# Altium PCB PCB3.PcbDoc
Units mil, origin at the board's own origin, x right, y up, seen from the top; angles counter-clockwise.
Board outline 954.83 x 960.81 mil, 2 copper layers (Top Layer, Bottom Layer); 36 components, 33 nets, 168 pads, 30 vias.
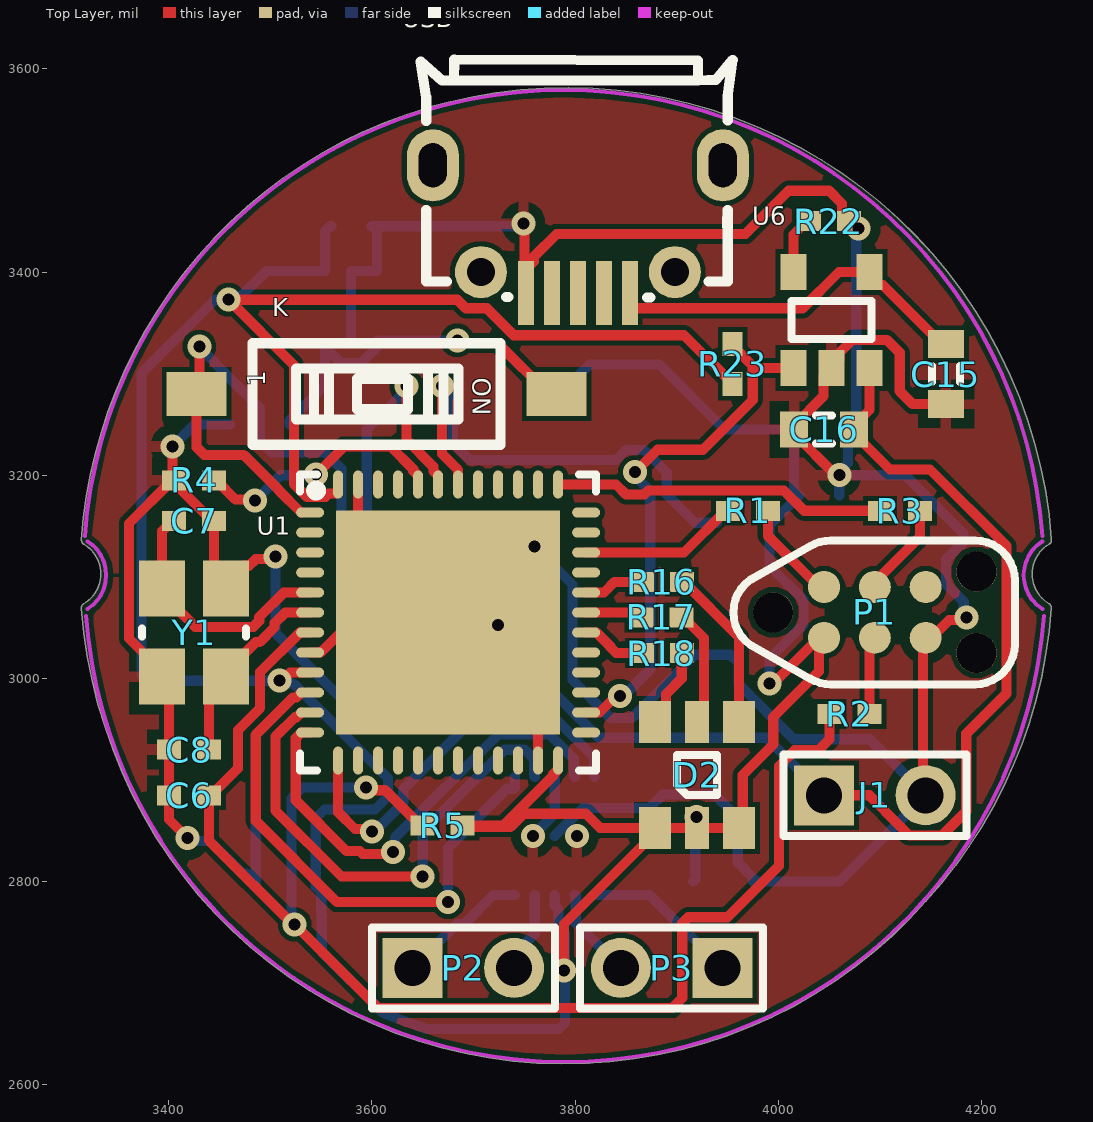
[diagram p0: Top Layer view]
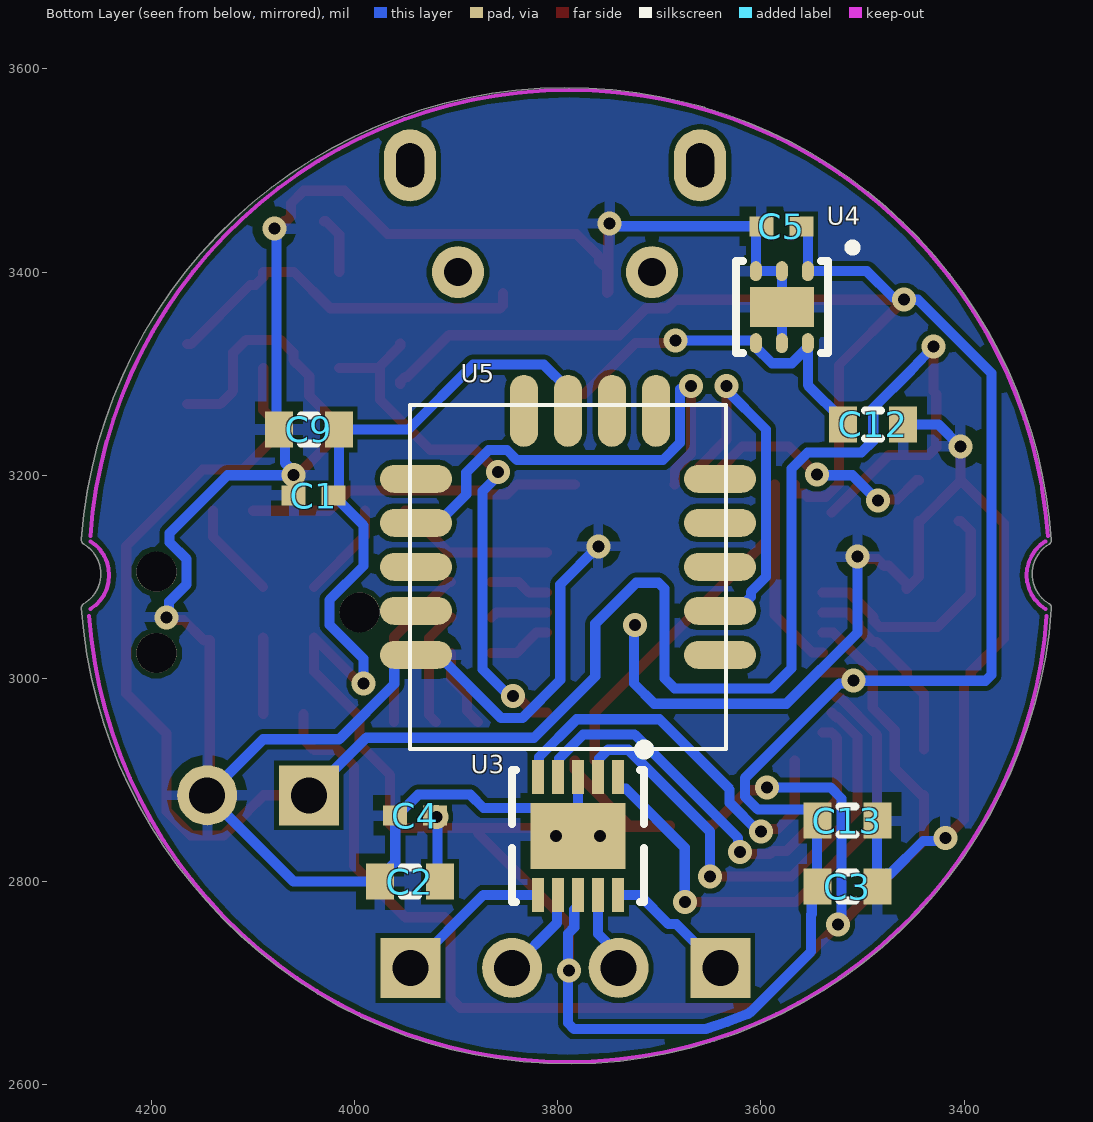
[diagram p1: Bottom Layer view, seen from below]

## Layer stack, top to bottom
Top Solder: solder mask 0.4, Solder Resist, Dk 3.5
Top Layer: signal copper 1.4
Dielectric 1: dielectric 12.6, FR-4, Dk 4.8
Bottom Layer: signal copper 1.4
Bottom Solder: solder mask 0.4, Solder Resist, Dk 3.5

## Board outline
3314.12,3068.48 cw(c3319.06,3069.36) 3316.51,3073.68 ccw(c3299.33,3102.83) 3333.17,3102.83 ccw(c3299.33,3102.83) 3316.53,3131.98 cw(c3319.08,3136.29) 3314.08,3136.65 cw(c3791.46,3102.83) 3365.62,3321.22 cw(c3788.74,3106.63) 3722.2,3576.37 cw(c3791.46,3102.83) 4268.79,3137.19 4268.87,3136.31 cw(c4263.86,3136.31) 4266.4,3131.99 ccw(c4283.58,3102.83) 4266.38,3073.69 cw(c4263.83,3069.37) 4268.84,3069.37 4268.83,3069.02 cw(c3791.46,3102.83) 4145.43,2780.76 cw(c3790,3095) 3345.37,2929.52 cw(c3791.46,3102.83)

## Design rules (kind name [scope] priority, off if disabled: settings)
Clearance [All] p1: gap=5 ignorepadtopadclearanceinfootprint=FALSE except(0: Arc-Hole Track-Hole SMDPad-Hole THPad-Hole Via-Hole Fill-Hole Poly-Hole Region-Hole Text-Hole)
PolygonConnect [All] p1: connectstyle=Relief reliefconductorwidth=10 reliefentries=4 polygonreliefangle="90 Angle" airgapwidth=10
RoutingVias [All] p1: holewidth=28 width=50 viastyle="Through Hole" minholewidth=28 minwidth=50 maxholewidth=28 maxwidth=50
SolderMaskExpansion [All] p1: expansion=4 istentingtop=FALSE
Width [All] p1: maxlimit=10 minlimit=10 preferedwidth=10
30 further rules are at their usual default settings.

## Classes and differential pairs
net class RGBLED[1..3]: RGBLED1 RGBLED2 RGBLED3
net class MOTOR_CONTROL[1..4]: MOTOR_CONTROL1 MOTOR_CONTROL2 MOTOR_CONTROL3 MOTOR_CONTROL4

## Components (designator, comment, footprint, x,y, rotation, side; value= is the part's Value field where it differs from the comment)
C1 "10nF" 0402 4040.32,3180 r180 bottom
C2 "1uF" 0603 3945.47,2800 r180 bottom
C3 "4.7uF" 0603 3515,2795 r0 bottom
C4 "100nF" 0402 3940.32,2865 r180 bottom
C5 "100nF" 0402 3580,3445 r180 bottom
C6 "100nF" 0402 3420,2885 r0 top
C7 "22pF" 0402 3425,3155 r180 top
C8 "22pF" 0402 3420,2930 r0 top
C9 "10uF" 0603 4045,3245 r180 bottom
C12 "1uF" 0603 3489.53,3250 r0 bottom
C13 "1uF" 0603 3515,2860 r0 bottom
C15 "4.7uF" 0603 4165,3299.53 r90 top
C16 "4.7uF" 0603 4045,3245 r0 top
D2 "SMLVN6RGB1W1" "3.5x2.8 mm 6-SMD" 3920,2905 r90 top
J1 "78171-0002" HDR1*2 4095,2885 r90 top
K "2.54-1P-PGT" SW-SMD_2P-L6.2-LS9.4 3610,3280 r0 top net-tie
P1 "TC2030-IDC-NL" TC2030-IDC-NL 4095,3065 r0 top
P2 "HEADER 2X1 0.05\" UNPOLARIZED" HDR1*2 3690,2715 r90 top
P3 "HEADER 2X1 0.05\" UNPOLARIZED" HDR1*2 3895,2715 r270 top
R1 "22R" 0402 3970,3165 r0 top
R2 "22R" 0402 4070,2965 r0 top
R3 "22R" 0402 4119.69,3165 r0 top
R4 "100K" 0402 3425,3195 r0 top
R5 "100K" 0402 3669.68,2855 r0 top
R16 "22.6R" 0402 3885.31,3095 r0 top
R17 "130R" 0402 3885,3060 r0 top
R18 "24.9R" 0402 3885.31,3025 r0 top
R22 "10K" 0402 4049.68,3450 r0 top
R23 "100K" 0402 3955,3309.69 r270 top
U1 "STM32F051C8U6" QFN50P700X700X60_HS-49L 3675,3055 r0 top
U3 "A3901SEJTR-T" DFN50P300X300X75_HS-11N 3780,2845 r0 bottom
U4 "ADP122ACPZ-3.3-R7" "LFCSP-6 2.0X2.0X0.55" 3579.41,3365.43 r0 bottom
U5 "DX-BT24-T" DX-BT24-T 3790,3100 r0 bottom
U6 "MCP73831T-2ACI/OT" SOT-23-OT5_L 4052.4,3352.76 r90 top
USB "MicroXNJ" MICRO-USB-SMD_MICROXNJ 3802.71,3442.15 r180 top
Y1 "7V-16.000MAAE-T" "3.2x2.5 CRYSTAL" 3425,3045 r270 top

## Footprints (in the part's own frame and the unit in brackets; to place one, negate y for a bottom-side part, rotate by r counter-clockwise, add the part's x,y. Pads: shape width x height; smd on the part's side, far side on the other; paste and mask are expansions set on the pad)
"3.2x2.5 CRYSTAL" [mm]
  rect 1.4x1.15 smd: 1(-1.1,-0.8) 2(1.1,-0.8) 3(1.1,0.8) 4(-1.1,0.8)
  silkscreen extent -0.1,-1.3 0.1,1.3, body extent -1.6,-1.25 1.6,1.25, height 0.8
"3.5x2.8 mm 6-SMD" [mm] "3.5 x 2.8 mm 6-SMD Flat Leads"
  rect 1.05x0.8 smd: 1(-1.325,1.05) 3(-1.325,-1.05) 4(1.325,-1.05) 6(1.325,1.05)
  rect 1.05x0.6 smd: 2(-1.325,0) 5(1.325,0)
  silkscreen extent -0.5,-0.5 0.5,0.5, body extent -1.75,-1.4 1.75,1.4, height 0.6
0402 [mm] "Chip Body 1.0 x 0.5 mm (LxW typ)"
  rect 0.6x0.5 smd: 1(-0.5,0) 2(0.5,0)
  body extent -0.55,-0.3 0.55,0.3, height 0.55
0603 [mm] "Chip Body 1.6 x 0.8 mm (LxW typ)"
  rect 0.7x0.9 smd: 1(-0.75,0) 2(0.75,0)
  silkscreen extent -0.2,-0.35 0.2,0.35, body extent -0.85,-0.48 0.85,0.48, height 0.9
DFN50P300X300X75_HS-11N [mm]
  rect 0.3x0.85 smd: 1(-1,-1.475) 2(-0.5,-1.475) 3(0,-1.475) 4(0.5,-1.475) 5(1,-1.475) 6(1,1.475) 7(0.5,1.475) 8(0,1.475) 9(-0.5,1.475) 10(-1,1.475)
  rect 2.38x1.65 smd: 11(0,0)
  silkscreen extent -1.78,-2.28 1.65,1.65, body extent -1.5,-1.5 1.5,1.5, height 0.75
DX-BT24-T [mm] "DX-BT24-T"
  oval 1.8x0.7 smd: 1(-3.8,1.95) 2(-3.8,0.85) 3(-3.8,-0.25) 4(-3.8,-1.35) 5(-3.8,-2.45) 10(3.8,-2.45) 11(3.8,-1.35) 12(3.8,-0.25) 13(3.8,0.85) 14(3.8,1.95)
  oval 0.7x1.8 smd: 6(-2.2,-4.15) 7(-1.1,-4.15) 8(0,-4.15) 9(1.1,-4.15)
  silkscreen extent -3.95,-4.3 3.95,4.3
HDR1*2 [mm]
  rect 1.5x1.5 hole 0.9: 1(0,1.27)
  round 1.5 hole 0.9: 2(0,-1.27)
  silkscreen extent -1.02,-2.29 1.02,2.29
"LFCSP-6 2.0X2.0X0.55" [mm] ". 6-Lead Lead Frame Chip Scale Package [LFCSP_UD]  2.00 mm?2.00 mm Body, Ultra Thin, Dual Lead  (CP-6-3)"
  oval 0.3x0.5 smd: 1(-0.65,-0.9) 2(0,-0.9) 3(0.65,-0.9) 4(0.65,0.9) 5(0,0.9) 6(-0.65,0.9)
  rect 1.6x1 smd: 7(0,0)
  silkscreen extent -1.86,-1.59 1.15,1.15, body extent -1,-1 1,1, height 0.6
MICRO-USB-SMD_MICROXNJ [mm]
  rect 0.4x1.6 smd paste-100 mask+0.051: 1(-1.3,1.596) 2(-0.65,1.596) 3(0,1.596) 4(0.65,1.596) 5(1.3,1.596)
  round 1.3 hole 0.7: 6(2.425,1.074) 9(-2.425,1.074)
  oval 1.3x1.8 hole 0.7 slot 1.1 at 90 deg: 7(3.625,-1.596) 8(-3.625,-1.596)
  silkscreen extent -3.87,-4.24 3.93,1.71
QFN50P700X700X60_HS-49L [mm] "QFN, 48-Leads, Body 7,00x7,00mm, Pitch 0,50mm, Thermal Pad 5,60x5,60mm, IPC High Density"
  oval 0.7x0.25 smd: 1(-3.45,2.75) 2(-3.45,2.25) 3(-3.45,1.75) 4(-3.45,1.25) 5(-3.45,0.75) 6(-3.45,0.25) 7(-3.45,-0.25) 8(-3.45,-0.75) 9(-3.45,-1.25) 10(-3.45,-1.75) 11(-3.45,-2.25) 12(-3.45,-2.75) 25(3.45,-2.75) 26(3.45,-2.25) 27(3.45,-1.75) 28(3.45,-1.25) 29(3.45,-0.75) 30(3.45,-0.25) 31(3.45,0.25) 32(3.45,0.75) 33(3.45,1.25) 34(3.45,1.75) 35(3.45,2.25) 36(3.45,2.75)
  oval 0.25x0.7 smd: 13(-2.75,-3.45) 14(-2.25,-3.45) 15(-1.75,-3.45) 16(-1.25,-3.45) 17(-0.75,-3.45) 18(-0.25,-3.45) 19(0.25,-3.45) 20(0.75,-3.45) 21(1.25,-3.45) 22(1.75,-3.45) 23(2.25,-3.45) 24(2.75,-3.45) 37(2.75,3.45) 38(2.25,3.45) 39(1.75,3.45) 40(1.25,3.45) 41(0.75,3.45) 42(0.25,3.45) 43(-0.25,3.45) 44(-0.75,3.45) 45(-1.25,3.45) 46(-1.75,3.45) 47(-2.25,3.45) 48(-2.75,3.45)
  rect 5.6x5.6 smd: 49(0,0)
  silkscreen extent -3.7,-3.7 3.7,3.7, body extent -3.55,-3.55 3.55,3.55, height 0.6
SOT-23-OT5_L [mm] "SOT23, 5-Leads, Body 2.9x1.6mm, Pitch 0.95mm, Lead Span 2.7mm, IPC High Density"
  rect 0.9x0.65 smd: 1(-1.2,0.95) 2(-1.2,0) 3(-1.2,-0.95) 4(1.2,-0.95) 5(1.2,0.95)
  silkscreen extent -0.48,-1 0.48,1, body extent -0.9,-1.55 0.9,1.55, height 1.45
SW-SMD_2P-L6.2-LS9.4 [mm]
  rect 1.5x1.1 smd paste+0 mask+0.051: 1(-4.636,-0.002) 2(4.364,-0.002)
  silkscreen extent -3.24,-1.27 2.96,1.27
TC2030-IDC-NL [mm] "TagConnector TC2030-IDC-NL"
  round 0.8 smd paste-1: 1(-1.27,-0.635) 2(-1.27,0.635) 3(0,-0.635) 4(0,0.635) 5(1.27,-0.635) 6(1.27,0.635)
  round 1 hole 1 unplated mask+0: ""(-2.54,0) ""(2.54,-1.016) ""(2.54,1.016)
  Top Layer pour cut-out: -1.27,-0.085 -1.27,0.085 -1.06,0.127 -0.881,0.246 -0.762,0.425 -0.72,0.635 -0.72,0.635 -0.55,0.635 -0.496,0.396 -0.343,0.205 -0.122,0.099 0.122,0.099 0.343,0.205 0.496,0.396 0.55,0.635 0.55,0.635 0.72,0.635 0.762,0.425 0.881,0.246 1.06,0.127 1.27,0.085 1.27,0.085 1.27,-0.085 1.06,-0.127 0.881,-0.246 0.762,-0.425 0.72,-0.635 0.72,-0.635 0.55,-0.635 0.496,-0.396 0.343,-0.205 0.122,-0.099 -0.122,-0.099 -0.343,-0.205 -0.496,-0.396 -0.55,-0.635 -0.55,-0.635 -0.72,-0.635 -0.762,-0.425 -0.881,-0.246 -1.06,-0.127 -1.27,-0.085
  silkscreen extent -3.54,-1.8 3.5,1.8, body extent -1.67,-1.03 1.67,1.03, height 0

## Part data
C1: "10nF 0402 X7R 25V ±5%", Supplier Part Number 1=1692285, Supplier 1=Farnell, Supplier 2=Digi-Key, Supplier Part Number 2=399-1279-1-ND
C2 C12 C13: "1uF 0603 X5R 10V ±10%", Supplier Part Number 1=1759399, Supplier 1=Farnell, Supplier 2=Digi-Key, Supplier Part Number 2=478-1251-1-ND
C3 C15 C16: "4.7uF 0603 X5R 10V ±10%", Supplier Part Number 1=2362098, Supplier 1=Farnell, Supplier 2=Digi-Key, Supplier Part Number 2=445-5170-1-ND
C4 C5 C6: "100nF 0402 X7R 16V ±10%", Supplier Part Number 1=1288252, Supplier 1=Farnell, Supplier 2=Digi-Key, Supplier Part Number 2=399-3521-1-ND
C7 C8: "22pF 0402 NP0/CG0 50V ±5%", Supplier Part Number 1=1414580, Supplier 1=Farnell, Supplier 2=Digi-Key, Supplier Part Number 2=490-5868-1-ND
C9: "10uF 0603 X5R 6.3V ±20%", Supplier Part Number 1=2456110, Supplier 1=Farnell, Supplier 2=Digi-Key, Supplier Part Number 2=490-10475-1-ND
D2: "ROHM SMLVN6RGB1W1 LED Tri-Color Blue/Green/Red Chip LED 6-Pin 1411 T/RLED Tri-Color Blue/Green/Red Chip LED 6-Pin 1411", Supplier Part Number 1=755-SMLVN6RGB1W1, Supplier 1=Mouser, Supplier 2=Digi-Key, Supplier Part Number 2=846-1187-1-ND
J1: "Molex Pico-EZmate™ Wire-to-Board Header, 2 contacts", Supplier Part Number 1=2313710, Supplier 1=Farnell, Supplier 2=Digi-Key, Supplier Part Number 2=WM4459CT-ND
P1: "TagConnect TC2030-IDC-NL SWD Programming Connector"
R1 R2 R3: "22R 0402 1/16W ±1%", Supplier Part Number 1=2072797, Supplier 1=Farnell, Supplier 2=Digi-Key, Supplier Part Number 2=541-22.0LCT-ND
R4 R5 R23: "100K 0402 1/16W ±1%", Supplier Part Number 1=2072519, Supplier 1=Farnell, Supplier 2=Digi-Key, Supplier Part Number 2=541-100KLCT-ND
R16: "22.6R 0402 1/16W ±0.05R", Supplier Part Number 1=2302454, Supplier 1=Farnell, Supplier 2=Digi-Key, Supplier Part Number 2=P22.6LCT-ND
R17: "130R 0402 1/16W ±0.05R", Supplier Part Number 1=2059115, Supplier 1=Farnell, Supplier 2=Digi-Key, Supplier Part Number 2=P130LCT-ND
R18: "24.9R 0402 1/16W ±0.05R", Supplier Part Number 1=2059102, Supplier 1=Farnell, Supplier 2=Digi-Key, Supplier Part Number 2=P24.9LCT-ND
R22: "10K 0402 1/16W ±1%", Supplier Part Number 1=2072517, Supplier 1=Farnell, Supplier 2=Digi-Key, Supplier Part Number 2=541-10.0KLCT-ND
U1: "STMICROELECTRONICS  STM32F051C8U6  MCU 32BIT CORTEX-M0 48MHZ UFQFPN-48", Supplier Part Number 1=2393638, Supplier 1=Farnell, Supplier 2=Digi-Key, Supplier Part Number 2=STM32F051C8U6-ND
U3: "ALLEGRO MICROSYSTEMS - A3901SEJTR-T - IC, MOTOR DRIVER", Supplier Part Number 1=1651947, Supplier 1=Farnell, Supplier 2=Digi-Key, Supplier Part Number 2=620-1159-1-ND
U4: "Analog Devices ADP122ACPZ-3.3-R7 - 5.5 V Input, 300 mA, Low Quiescent  Current, CMOS Linear Regulator", Supplier Part Number 1=2457164, Supplier 1=Farnell, Supplier 2=Digi-Key, Supplier Part Number 2=ADP122ACPZ-3.3-R7CT-ND
U6: "Miniature Single-Cell, Fully Integrated Li-Ion, Li-Polymer Charge Management Controller, 4.2V, 5-Pin SOT-23, Industrial Temperature, Tape and Reel", Supplier Part Number 1=1332158, Code_IPC=SOT23-5, ComponentLink1Description=Datasheet, ComponentLink1URL=http://ww1.microchip.com/downloads/en/DeviceDoc/21984e.pdf, ComponentLink2Description="Packaging Specification", ComponentLink2URL=http://www.microchip.com/stellent/groups/techpub_sg/documents/packagingspec/en012702.pdf, ComponentLink3Description="Microchip.com Home", ComponentLink3URL=http://www.microchip.com/, DatasheetVersion="revE, Sep-2008", LatestRevisionDate=27-Nov-2009, LatestRevisionNote="Updated to datasheet revision E, Sep-2008", PackageDescription="5-Lead Plastic Small Outline Transistor (OT) [SOT-23]", PackageReference=SOT-23-OT5, PackageVersion="revBB, Aug-2009", Published=29-Jan-2009, Publisher="Altium Limited", Supplier 1=Farnell
USB: Core Colour=黑色, Current Rating - Power (Max)=1.8A, JLCPCB Part Class="Extended Part", LCSC Part Name="Micro-B 母 卧贴", Manufacturer="SHOU HAN(首韩)", Operating Temperature Range=-20℃~+85℃, Rated Voltage (Max)=30V, Add into BOM=yes, Connect-Disconnect Life=5千次, Connector Type=Micro-B, Convert to PCB=yes, Datasheet=https://atta.szlcsc.com/upload/public/pdf/source/20220415/2494EDFF499AF6F852F7C820374B6AF3.pdf, Device=MicroXNJ, Gender=母, Manufacturer Part=MicroXNJ, Mounting Style=卧贴, Number of Contacts=5P, Number of Ports=1, Standard="USB 2.0", Supplier=LCSC, Supplier Footprint=SMD, Supplier Part=C404969, Symbol=MICROXNJ
Y1: "TXC - 7V-16.000MAAE-T, 16MHZ, 30PPM, 12PF - CRYSTAL", Supplier Part Number 1=887-1462-1-ND, Supplier 1=Digi-Key, Supplier 2=Farnell, Supplier Part Number 2=1892172
U5: PCB DECAL=DX-BT24-S

## Via types
v1: diameter 23.62, hole 11.81, Top Layer to Bottom Layer, 30 vias

## Nets (pads, with @x,y where several pads share a name; then routed paths per layer and width w, separated by ;. In a path a pad name is that pad's centre, name@x,y a point inside that pad or via, vN(x,y) a via of type N, cw(c..) or ccw(c..) an arc to the next point about the centre after c; other vN are vias at no path point)
+3.3V: C1.2 C2.2 C3.2 C4.2 C5.2 C9.2 C13.2 D2.1 D2.2 D2.3 P1.1 R5.2 R23.2 U1.9 U1.24 U1.48 U3.8 U4.1 U5.8 | length 3807.9
  Top Layer w10: v1@3510.31,2996.44 3519.58,3005.71 3539.09,3005.71 U1.9 ; U1.48 3566.73,3182.13 3566.65,3182.05 3557.33,3182.05 3554.05,3178.77 3535.98,3178.77 3523.21,3191.55 3523.21,3308.53 v1(3459,3372.74) 3684.04,3372.74 3692.5,3364.28 3713.04,3364.28 3739.51,3337.8 3907.2,3337.8 3948.19,3296.81 3950.16,3296.81 3955,3291.97 R23.2 ; U1.24 3783.27,2910.47 3778.5,2905.71 3778.5,2904.13 3729.37,2855 R5.2 3690.34,2854.03 3736.54,2854.03 3749.31,2866.81 3810.69,2866.81 3824.66,2852.83 D2.1 ; v1(3789,2712.74) 3789,2758.25 3878.66,2847.91 D2.1 ; v1@3995,2995 4040,3040 4040,3007.09 3995,2962.09 3995,2935 3965,2905 3965,2856.5 D2.3 D2.2 D2.1
  Bottom Layer w10: v1(3459,3372.74) 3445.51,3372.74 3373.12,3300.35 3373.12,3003.6 3378.98,2997.74 v1(3509,2997.74) 3511.61,2995.13 3522.45,2995.13 3615.81,2901.77 3615.81,2883.7 3603.04,2870.93 3553.31,2870.93 3544.53,2862.15 C13.2 ; v1@3470,3375 3495.87,3400.87 U4.1 3553.82,3440.16 3558.66,3445 C5.2 ; C3.2 3544.76,2795.24 C13.2@3544.76,2859.76 ; C3.2@3545,2795 3550.08,2789.92 3550.08,2768.14 3550.69,2767.53 3550.69,2731.12 3609.71,2672.09 3609.76,2672.05 ccw(c3616.78,2679.16) 3612.89,2669.95 ccw(c3790,3095) 3654.23,2655 ; 3654.22,2655 3784.14,2655 3790,2660.86 3790,2748.79 3783.78,2755.01 3783.78,2772.32 3780,2776.1 U3.8 ; U5.8 3790,3285.04 3813.78,3308.82 3883.17,3308.82 3946.98,3245 C9.2 C1.2@4015.47,3184.84 ; C2.2 3918.29,2802.34 3918.29,2862.66 v1(3919.46,2863.83) C4.2 ; v1(3991.26,2994.95) 3991.26,3019.28 4024.69,3052.7 4024.69,3077.3 3991.26,3110.72 3991.26,3150.64 C1.2
+5: C15.2 U6.4 USB.1 | length 371.5
  Top Layer w10: USB.1 3853.89,3367.16 3856.76,3364.29 4023.94,3364.29 4059.65,3400 U6.4 4089.8,3395.08 4097.6,3387.28 4102.83,3387.28 4161.06,3329.06 C15.2
BT_RX: U1.43 U5.2 | length 373.6
  Top Layer w10: v1(3634,3287.74) 3634,3234.78 3660.47,3208.31 3660.47,3204.21 3665.16,3199.53 U1.43
  Bottom Layer w10: v1@3635,3285 3594.96,3244.96 3594.96,3099.99 3609.96,3084.99 3609.96,3080.07 3623.49,3066.54 U5.2
BT_TX: U1.42 U5.11 | length 470
  Top Layer w10: v1(3669,3287.74) 3669,3221 3684.76,3205.24 3684.76,3190.91 U1.42
  Bottom Layer w10: v1@3679.61,3285 3679.61,3231.88 3696.49,3215 3840.2,3215 3849.95,3224.74 3868.01,3224.74 3890.12,3202.64 3890.12,3180.99 3917.95,3153.15 U5.11
CHARGING: R23.1 U1.26 U6.1 | length 531
  Top Layer w10: U1.26 3810.91,2966.5 3824.07,2966.5 3840.32,2982.74 v1(3844,2982.74) ; v1(3858.98,3202.93) 3881.05,3225 3925.8,3225 3974.84,3274.05 3974.84,3307.56 ; R23.1 3955,3327.4 3974.84,3307.56 ; U6.1 3976.89,3305.51 3974.84,3307.56
  Bottom Layer w10: v1@3845,2980 3874,3009 3874,3184.22 3858.98,3199.24 v1(3858.98,3202.93)
GND: C1.1 C2.1 C3.1 C4.1 C5.1 C6.1 C7.1 C8.1 C9.1 C12.1 C13.1 C15.1 C16.1 J1.2 P1.5 R4.1 R22.2 U1.8 U1.23 U1.47 U1.49 U3.3 U3.11 U4.2 U4.3 U4.5 U4.7 U5.14 U6.2 USB.5 Y1.2 Y1.4 | length 4657.3
  Top Layer w10: v1(3403.75,3228.26) R4.1@3403.75,3195 ; v1(3418.49,2842.87) 3400.32,2861.05 C6.1 C8.1 3400.32,2994.88 Y1.2 3393.5,3006.61 3360.87,3039.25 3360.87,3152.52 3403.35,3195 R4.1@3403.75,3195 ; v1(3505,3120) 3502.39,3117.39 3485.58,3117.39 3479.06,3110.87 3474.13,3110.87 3456.5,3093.23 Y1.4 3444.68,3100.12 C7.1 3442.72,3155 3403.75,3193.97 R4.1@3403.75,3195 ; U1.8 3539.25,3025.55 3549.53,3025.55 3586.42,3062.44 U1.49@3586.42,3143.58 ; U1.47 U1.49@3586.42,3143.58 ; v1(3749,3447.74) 3750.27,3446.47 3750.27,3380.56 USB.5 3751.53,3402.92 3759.25,3410.64 3759.25,3414.94 3781.78,3437.47 3967.47,3437.47 4010,3480 4050,3480 4062.56,3467.44 4062.56,3454.84 4067.4,3450 R22.2 ; U1.23 3763.58,2966.42 U1.49 U1.49@3586.42,3143.58 ; v1(4060,3200) 4056.54,3200 4015.47,3241.06 C16.1 4015.47,3248.94 4044.61,3278.07 4044.61,3297.72 U6.2 4060.2,3313.31 4060.2,3320.56 4072.87,3333.23 4106.74,3333.23 4119.51,3320.46 4119.51,3282.77 4132.28,3270 C15.1 ; J1.2 4142.5,2887.5 4142.5,3037.5 4148.32,3037.5 4168.3,3057.49 4182.37,3057.49 v1(4184.97,3060.09)
  Bottom Layer w10: v1(3403.75,3228.26) 3425.48,3250 C12.1 ; v1@3420,2840 3440.47,2840 3472.76,2807.72 3476.69,2807.72 3485.47,2798.94 C3.1 3485.71,2795.24 3485.71,2859.76 C13.1@3485.94,2860 ; v1(3505,3120) 3505,3045 3575,2975 3705,2975 3725,2995 v1@3725,3050 ; U4.5 U4.7 U4.2 U4.3 C5.1@3605,3440.16 ; C5.1 v1@3750,3445 ; v1(3758.35,2845) 3780,2866.65 U3.3 ; v1(3760,3130) 3797.48,3092.52 3797.48,2998.41 3834.97,2960.93 3855.65,2960.93 3917.95,3023.23 U5.14 3952.81,3023.23 3960.92,3015.12 3960.92,2994.45 4015.22,2940.15 4089.85,2940.15 J1.2 4060,2800 C2.1 3975,2803.94 3960,2818.94 C4.1 3958.03,2865 3937.39,2885.64 3886.2,2885.64 3873.04,2872.48 3807.48,2872.48 U3.11 ; C1.1 v1(4060,3200) ; v1(4079,3442.74) 4076.76,3440.5 4076.76,3247.24 C9.1 4074.53,3238.21 4068.6,3232.28 4068.6,3212.28 4060,3203.69 v1(4060,3200) ; v1(4184.97,3060.09) 4182.49,3062.57 4182.49,3075.53 4165.31,3092.7 4165.31,3117.3 4182.11,3134.09 4182.11,3142.89 4125,3200 v1(4060,3200)
  other v1: 3801.65,2845 3724,3052.74
IMU_INT: U1.25
MCU_X1_16MHZ: C7.2 U1.5 Y1.1 | length 258
  Top Layer w10: Y1.1 Y1.1@3393.5,3093.23 ; C7.2 3403.35,3155 3393.5,3145.16 Y1.1@3393.5,3093.23 ; U1.5 3539.09,3084.45 3513.12,3084.45 3489.13,3060.47 3489.13,3056.61 3483.28,3050.75 3426.14,3050.75 3393.5,3083.39 Y1.1@3393.5,3093.23
MCU_X2_16MHZ: C8.2 U1.6 Y1.3 | length 192.6
  Top Layer w10: C8.2 3439.69,2984.88 Y1.3 3456.5,3006.61 3485.63,3035.75 3489.49,3035.75 3504.13,3050.39 3504.13,3054.25 3514.65,3064.76 3539.09,3064.76 U1.6
MOTOR_CONTROL1: U1.10 U3.1 | length 523.2
  Top Layer w10: U1.10@3530.39,2986.02 3525.71,2981.34 3522.61,2981.34 3485.71,2944.44 3485.71,2859.76 3565.47,2780 v1(3675,2780)
  Bottom Layer w10: v1(3675,2780) 3675,2833.47 3732.87,2891.34 3739.72,2891.34 3740.63,2892.24 U3.1
MOTOR_CONTROL2: U1.11 U3.2 | length 488.7
  Top Layer w10: U1.11@3530.39,2966.34 3525.79,2961.73 3524.21,2961.73 3505,2942.52 3505,2870 3570,2805 v1(3650,2805)
  Bottom Layer w10: v1(3650,2805) 3650,2849.22 3730.58,2929.8 3750.68,2929.8 3759.41,2921.07 3759.41,2903.98 U3.2
MOTOR_CONTROL3: U1.12 U3.4 | length 457.1
  Top Layer w10: U1.12 3530.47,2946.73 3525,2941.26 3525,2880 3575,2830 3588.27,2830 3590.97,2827.31 3618.66,2827.31 v1(3620.69,2829.34)
  Bottom Layer w10: v1(3620.69,2829.34) 3622.61,2831.26 3622.61,2843.04 3724.37,2944.8 3775.05,2944.8 3798.78,2921.07 3798.78,2903.98 U3.4
MOTOR_CONTROL4: U1.13 U3.5 | length 399.5
  Top Layer w10: U1.13 3566.73,2868.29 3583.3,2851.72 3597.39,2851.72 v1(3600,2849.12)
  Bottom Layer w10: v1(3600,2849.12) 3602.44,2849.12 3630.81,2877.49 3630.81,2890.81 3699.8,2959.8 3781.26,2959.8 3818.46,2922.6 3818.46,2903.98 U3.5
NetC12_2: C12.2 K.2 U4.4 U4.6 | length 361.5
  Top Layer w10: v1@3685,3330 3723.86,3330 3773.94,3279.93 K.2
  Bottom Layer w10: C12.2 3519.06,3253.94 3553.82,3288.7 U4.6@3553.82,3326.06 ; U4.6 U4.6@3553.82,3326.06 ; v1(3684,3332.74) 3605.84,3332.74 3605,3331.9 U4.4 3605,3326.06 3589.09,3310.16 3569.72,3310.16 U4.6@3553.82,3326.06
NetD2_4: D2.4 R16.2 | length 162.3
  Top Layer w10: R16.2 3906.97,3095 3961.34,3040.63 D2.4
NetD2_5: D2.5 R17.2 | length 116
  Top Layer w10: R17.2 3906.65,3060 3926.81,3039.84 3926.81,2963.98 D2.5
NetD2_6: D2.6 R18.2 | length 78.7
  Top Layer w10: D2.6 3889.41,2967.91 3889.41,2984.57 3905,3000.16 R18.2
NetP1_2: P1.2 R1.2 | length 95.8
  Top Layer w10: R1.2 3989.69,3140.31 P1.2@4040,3090
NetP1_3: P1.3 R2.2 | length 75.1
  Top Layer w10: R2.2 4089.84,2965.16 4089.84,3039.84 P1.3@4090,3040
NetP1_4: P1.4 R3.2 | length 95.4
  Top Layer w10: P1.4@4090,3090 4139.37,3139.37 R3.2
NetP2_1: P2.1 U3.10 | length 130.4
  Bottom Layer w10: P2.1 3683.19,2758.19 3690.98,2758.19 3719.72,2786.93 U3.10
NetP2_2: P2.2 U3.9 | length 80.3
  Bottom Layer w10: P2.2 3740,2728.27 3760.31,2748.59 U3.9
NetP3_1: P3.1 U3.6 | length 155.4
  Bottom Layer w10: U3.6 3873.07,2786.93 P3.1
NetP3_2: P3.2 U3.7 | length 90.7
  Bottom Layer w10: U3.7 3800.59,2786.02 3800.59,2759.41 P3.2
NetR4_2: R4.2 U1.44 | length 252.6
  Top Layer w10: R4.2 3446.65,3195 3465.64,3176.02 3483.98,3176.02 v1(3485,3175) ; v1(3545.02,3200.59) 3572.64,3228.21 3618.37,3228.21 3640.71,3205.87 3640.71,3204.29 3645.47,3199.53 U1.44
  Bottom Layer w10: v1(3485,3175) 3510,3200 3544.43,3200 v1(3545.02,3200.59)
NetR22_1: R22.1 U6.5 | length 57.4
  Top Layer w10: U6.5 4015,3436.97 4028.03,3450 R22.1
NRST: C6.2 R2.1 R5.1 U1.7 | length 1447.3
  Top Layer w10: v1(3524,2757.74) 3601.74,2680 3601.8,2680 3606.33,2675.47 3895.47,2675.47 3905.47,2685.47 3905.47,2759.14 3911.33,2765 3950,2765 4000.61,2815.61 4000.61,2913.81 4016.22,2929.41 4039.57,2929.41 4050.32,2940.16 R2.1 ; v1@3525,2755 3439.69,2840.31 C6.2 3441.65,2885 3468.25,2911.59 3468.25,2949.11 3490,2970.86 3490,3006.26 3528.82,3045.08 3539.09,3045.08 U1.7 ; v1@3595,2890 3613.03,2890 3648.03,2855 R5.1 R5.1@3651.97,2855
  Bottom Layer w10: v1@3525,2755 3520.75,2759.25 3520.75,2881.86 3531.63,2892.74 v1(3594,2892.74)
RGBLED1: R17.1 U1.31 | length 56.5
  Top Layer w10: U1.31 3810.91,3064.76 3860.55,3064.76 R17.1
RGBLED2: R16.1 U1.32 | length 59.1
  Top Layer w10: U1.32 3810.91,3084.61 3828.43,3084.61 3838.82,3095 R16.1
RGBLED3: R18.1 U1.30 | length 63.6
  Top Layer w10: U1.30 3810.91,3045.08 3821.18,3045.08 3834.61,3031.65 3834.61,3030.86 3840.46,3025 R18.1
SWCLK: R3.1 U1.37 | length 330.5
  Top Layer w10: U1.37 3840.24,3190.83 3849.95,3181.12 3868.01,3181.12 3871.74,3184.84 4005.64,3184.84 4025.48,3165 R3.1
SWDIO: R1.1 U1.34 | length 156.5
  Top Layer w10: U1.34 3907.24,3123.9 3948.35,3165 R1.1
VBAT: C16.2 J1.1 K.1 U1.1 U6.3 | length 2041.1
  Top Layer w10: v1(3430.18,3326.56) 3430.18,3282.62 K.1 3427.48,3227.52 3435,3220 3473.74,3220 3508.21,3185.53 3508.21,3185.34 3529.77,3163.77 3529.97,3163.77 U1.1@3530.39,3163.35 ; J1.1 4089.53,2885 4105.47,2869.06 4105.47,2868.63 4128.63,2845.47 4161.37,2845.47 4185,2869.1 4185,2945.63 4224.69,2985.31 4224.69,3130.31 4149.37,3205.63 4109.96,3205.63 4074.53,3241.06 C16.2 4074.53,3248.94 4089.8,3264.21 U6.3
  Bottom Layer w10: v1(3430.18,3326.56) 3452.17,3303.47 3489.53,3266.11 3489.53,3233.89 3501.13,3222.28 3542.8,3222.28 3542.91,3222.4 3554.05,3222.4 3570,3206.45 3570,3010 3590,2990 3685,2990 3695,3000 3695,3088.28 3700.86,3094.14 3722.73,3094.14 3763.09,3053.79 3763.09,3001.91 3823.38,2941.62 3988.38,2941.62 J1.1
pads on no net: P1. P1.6 U1.2 U1.3 U1.4 U1.14 U1.15 U1.16 U1.17 U1.18 U1.19 U1.20 U1.21 U1.22 U1.27 U1.28 U1.29 U1.33 U1.35 U1.36 U1.38 U1.39 U1.40 U1.41 U1.45 U1.46 U5.1 U5.3 U5.4 U5.5 U5.6 U5.7 U5.9 U5.10 U5.12 U5.13 USB.2 USB.3 USB.4 USB.6 USB.7 USB.8 USB.9

## Polygon pours and split planes (outlines as drawn)
GND on Top Layer "GND_L01_P000" (solid, pour order 0): 3314.12,3068.48 cw(c3319.06,3069.36) 3316.51,3073.68 ccw(c3299.33,3102.83) 3333.17,3102.83 ccw(c3299.33,3102.83) 3316.53,3131.98 cw(c3319.08,3136.29) 3314.08,3136.65 cw(c3791.46,3102.83) 3365.62,3321.22 cw(c3788.74,3106.63) 3722.2,3576.37 cw(c3791.46,3102.83) 4268.79,3137.19 4268.87,3136.31 cw(c4263.86,3136.31) 4266.4,3131.99 ccw(c4283.58,3102.83) 4266.38,3073.69 cw(c4263.83,3069.37) 4268.84,3069.37 4268.83,3069.02 cw(c3791.46,3102.83) 4145.43,2780.76 cw(c3790,3095) 3345.37,2929.52 cw(c3791.46,3102.83)
GND on Bottom Layer "GND_L02_P001" (solid, pour order 1): 3314.12,3068.48 cw(c3319.06,3069.36) 3316.51,3073.68 ccw(c3299.33,3102.83) 3333.17,3102.83 ccw(c3299.33,3102.83) 3316.53,3131.98 cw(c3319.08,3136.29) 3314.08,3136.65 cw(c3791.46,3102.83) 3365.62,3321.22 cw(c3788.74,3106.63) 3722.2,3576.37 cw(c3791.46,3102.83) 4268.79,3137.19 4268.87,3136.31 cw(c4263.86,3136.31) 4266.4,3131.99 ccw(c4283.58,3102.83) 4266.38,3073.69 cw(c4263.83,3069.37) 4268.84,3069.37 4268.83,3069.02 cw(c3791.46,3102.83) 4145.43,2780.76 cw(c3790,3095) 3345.37,2929.52 cw(c3791.46,3102.83)

## Keep-outs
Keep-Out Layer:
  lines w3.94: 3317.48,3140 cw(c3788.74,3106.63) 4260,3140 ; 3318.74,3061.63 ccw(c3790,3095) 4261.26,3061.63 ; 3320,3068.23 ccw(c3299.13,3101.62) 3320,3135 ; 4260,3068.23 cw(c4280.87,3101.62) 4260,3135

## Silkscreen, mask and mechanical layers (free items; w line width, h text height)
Mechanical 2:
  lines w10: 3319.06,3069.36 ccw(c3299.33,3102.83) 3319.08,3136.29 cw(c3791.46,3102.83) 4263.82,3136.36 ; 3319.09,3069.31 ccw(c3791.46,3102.83) 4263.83,3069.37 cw(c4283.58,3102.83) 4263.86,3136.31

## Text inside footprints (layer, text, board x,y; h text height)
K: Top Overlay "1" at 3501.11,3287.41 h30 r90; Top Overlay "ON" at 3693.23,3296.08 h30 r270